# Altium PCB 24V-10A-Power-Board-v1.0.PcbDoc (part 1 of 5)
Units mil, origin at the board's own origin, x right, y up, seen from the top; angles counter-clockwise.
Board outline 6000 x 4000 mil, 2 copper layers (Top Layer, Bottom Layer); 609 components, 307 nets, 1491 pads, 0 vias.
Unrouted connection lines stored in the file: 1132.
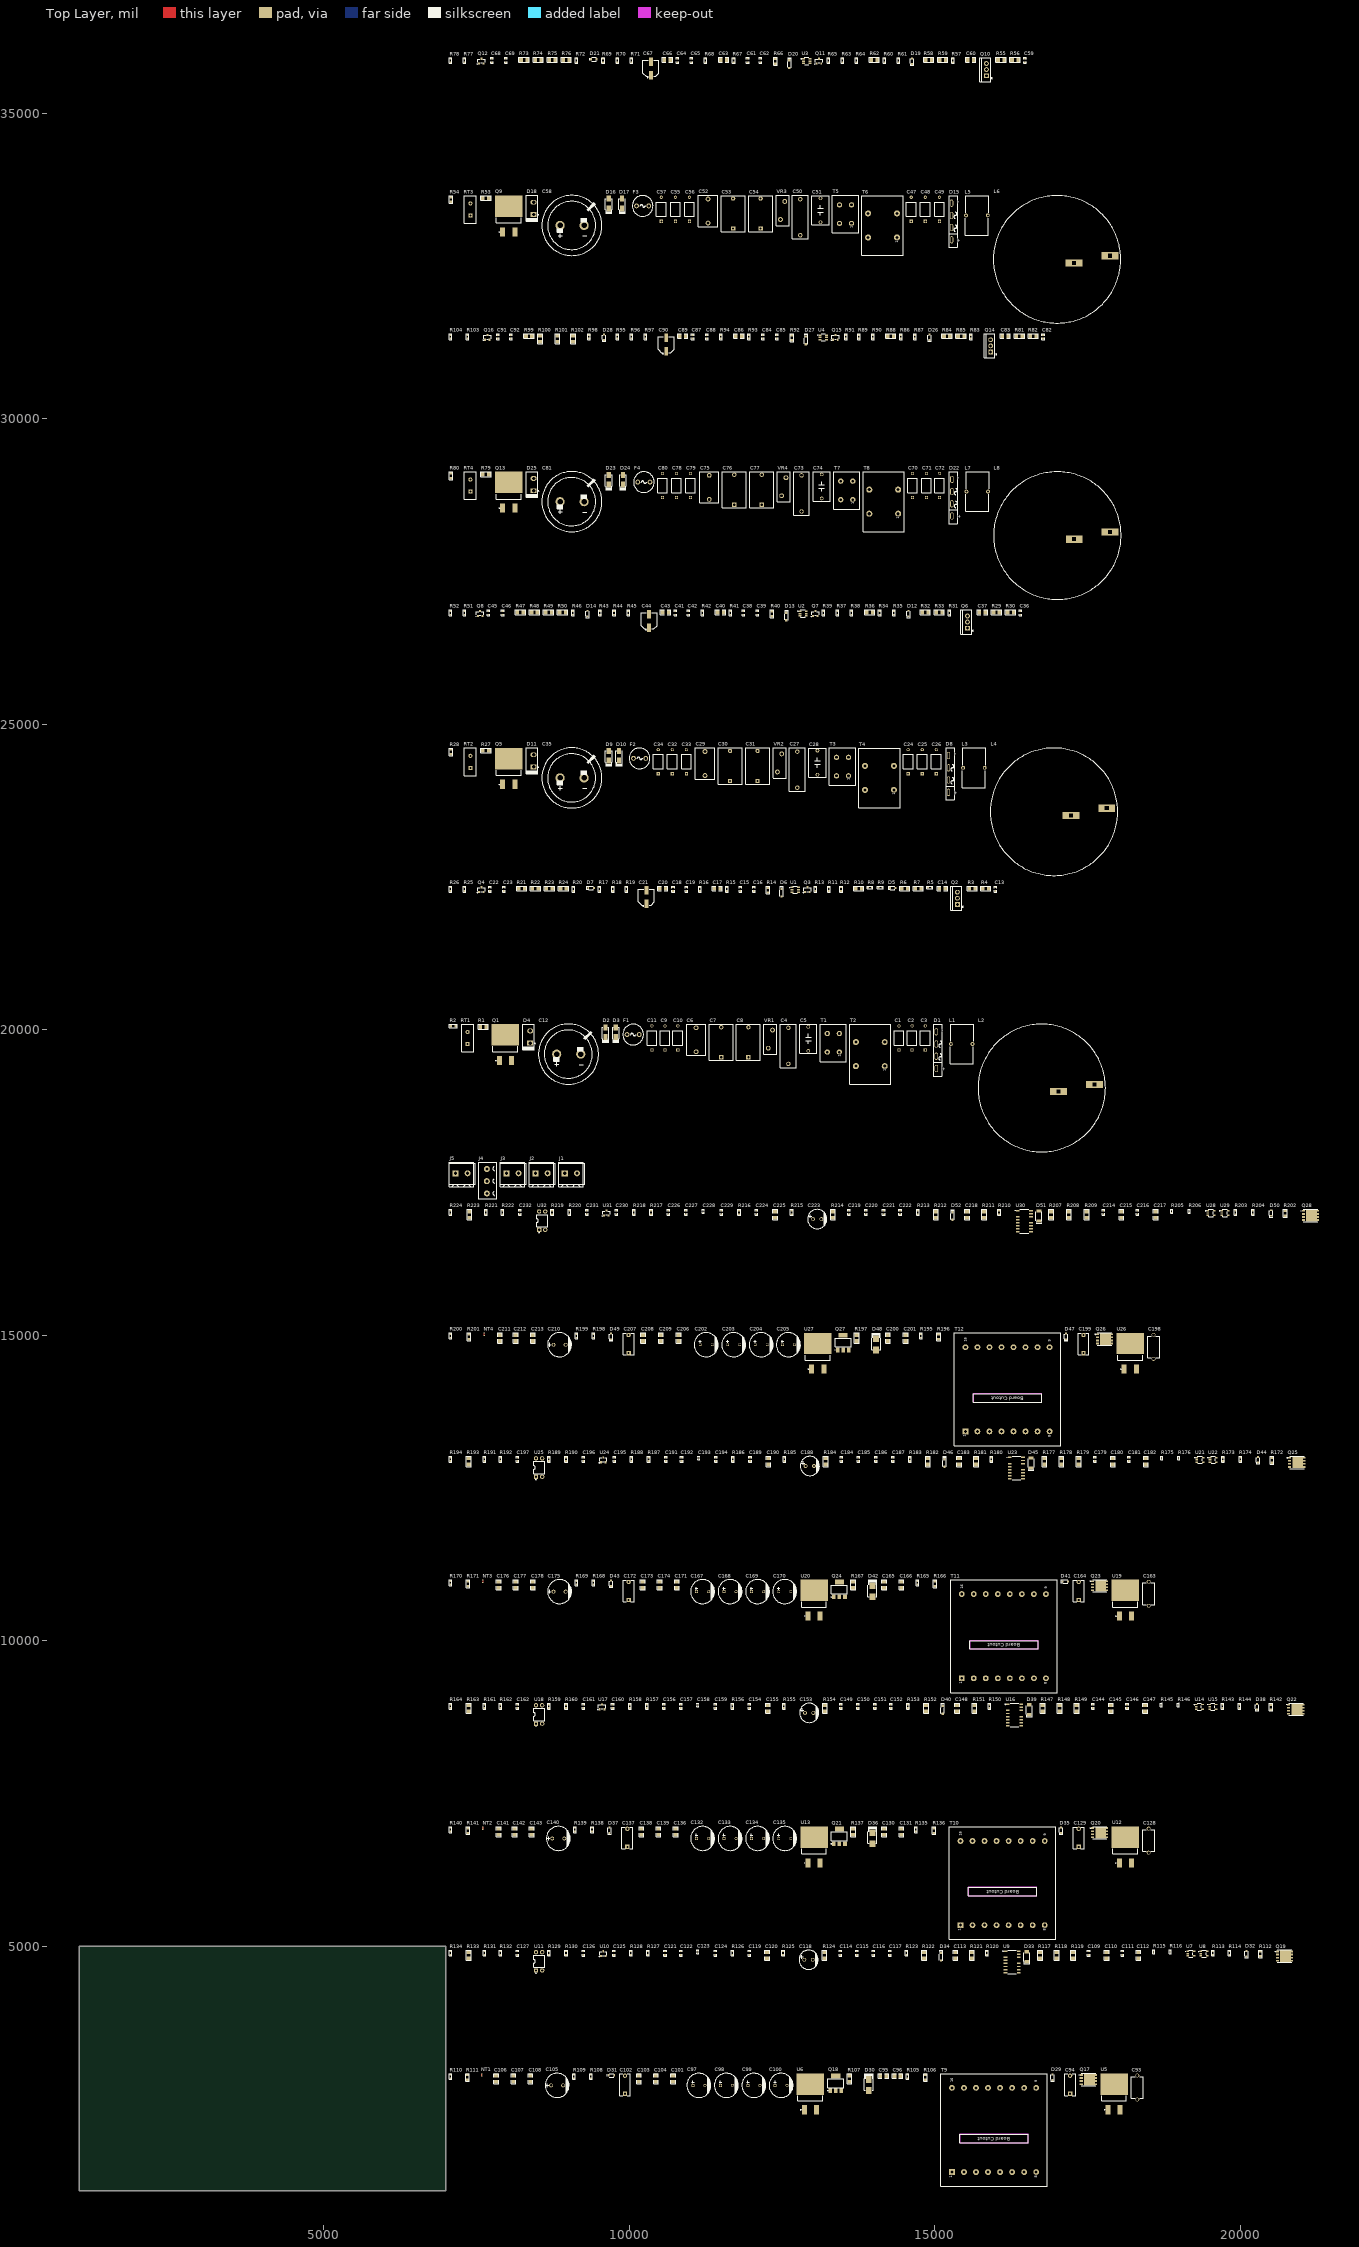
[diagram p0: Top Layer view]
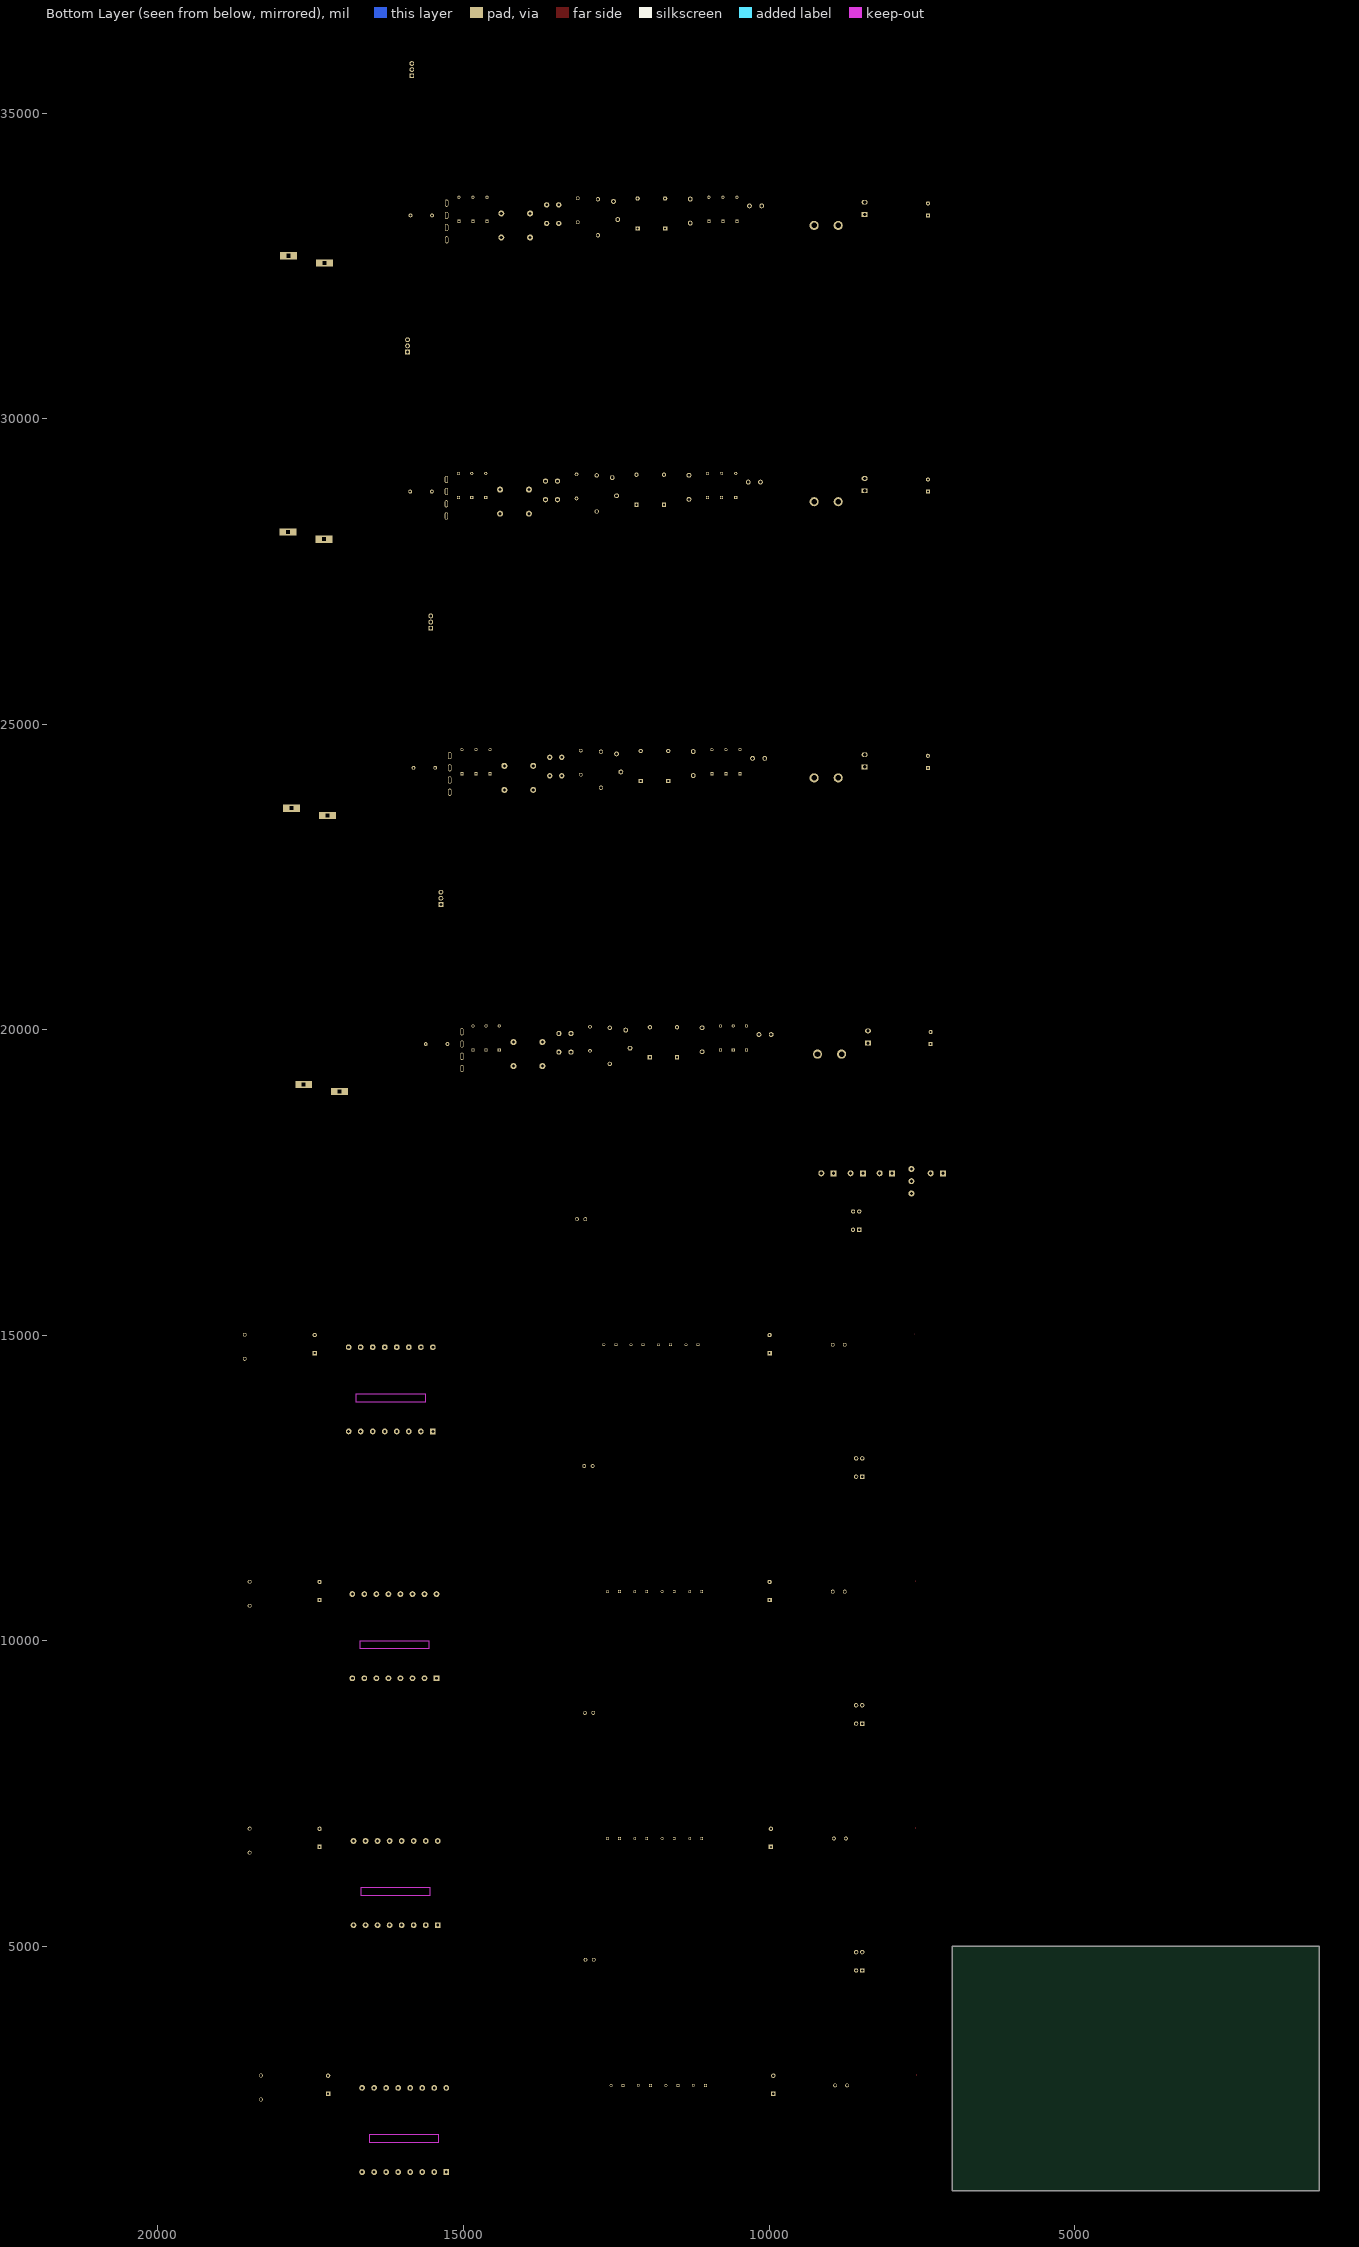
[diagram p1: Bottom Layer view, seen from below]

## Layer stack, top to bottom
Top Solder: solder mask 0.4, Solder Resist, Dk 3.5
Top Layer: signal copper 1.4
Dielectric 1: dielectric 12.6, FR-4, Dk 4.8
Bottom Layer: signal copper 1.4
Bottom Solder: solder mask 0.4, Solder Resist, Dk 3.5

## Board outline
1000,1000 7000,1000 7000,5000 1000,5000

## Design rules (kind name [scope] priority, off if disabled: settings)
Clearance [All] p1: gap=10 ignorepadtopadclearanceinfootprint=FALSE
PolygonConnect [All] p1: connectstyle=Relief reliefconductorwidth=10 reliefentries=4 polygonreliefangle="90 Angle" airgapwidth=10
RoutingVias [All] p1: holewidth=28 width=50 viastyle="Through Hole" minholewidth=28 minwidth=50 maxholewidth=28 maxwidth=50
SolderMaskExpansion [All] p1: expansion=4 istentingtop=FALSE
SupplyNets "Schematic Supply Nets_7" [InNet('GND')] p1: voltage=0.000
SupplyNets "Schematic Supply Nets_6" [InNet('SGND-C1')] p2: voltage=0.000
SupplyNets "Schematic Supply Nets_5" [InNet('SGND-C3')] p3: voltage=0.000
SupplyNets "Schematic Supply Nets_4" [InNet('SGND-C4')] p4: voltage=0.000
SupplyNets "Schematic Supply Nets_3" [InNet('EARTH')] p5: voltage=0.000
SupplyNets "Schematic Supply Nets_2" [InNet('SGND-C2')] p6: voltage=0.000
SupplyNets "Schematic Supply Nets_1" [InNet('AC_N')] p7: voltage=0.000
SupplyNets "Schematic Supply Nets" [InNet('AC_L')] p8: voltage=0.000
Width [All] p1: maxlimit=10 minlimit=10 preferedwidth=10
30 further rules are at their usual default settings.

## Classes and differential pairs
component class U_Power_Sheet4: C47 C48 C49 C50 C51 C52 C53 C54 C55 C56 C57 C58 C59 C60 C61 C62 C63 C64 C65 C66 C67 C68 C69 D15 D16 D17 D18 D19 D20 D21 F3 L5 L6 Q9 Q10 Q11 Q12 R53 R54 R55 R56 R57 R58 R59 R60 R61 R62 R63 R64 R65 R66 R67 R68 R69 R70 R71 R72 R73 R74 R75 R76 R77 R78 RT3 T5 T6 U3 VR3
component class U_Power_Sheet3: C70 C71 C72 C73 C74 C75 C76 C77 C78 C79 C80 C81 C82 C83 C84 C85 C86 C87 C88 C89 C90 C91 C92 D22 D23 D24 D25 D26 D27 D28 F4 L7 L8 Q13 Q14 Q15 Q16 R79 R80 R81 R82 R83 R84 R85 R86 R87 R88 R89 R90 R91 R92 R93 R94 R95 R96 R97 R98 R99 R100 R101 R102 R103 R104 RT4 T7 T8 U4 VR4
component class U_Power_Sheet2: C24 C25 C26 C27 C28 C29 C30 C31 C32 C33 C34 C35 C36 C37 C38 C39 C40 C41 C42 C43 C44 C45 C46 D8 D9 D10 D11 D12 D13 D14 F2 L3 L4 Q5 Q6 Q7 Q8 R27 R28 R29 R30 R31 R32 R33 R34 R35 R36 R37 R38 R39 R40 R41 R42 R43 R44 R45 R46 R47 R48 R49 R50 R51 R52 RT2 T3 T4 U2 VR2
component class U_Power_Sheet1: C1 C2 C3 C4 C5 C6 C7 C8 C9 C10 C11 C12 C13 C14 C15 C16 C17 C18 C19 C20 C21 C22 C23 D1 D2 D3 D4 D5 D6 D7 F1 L1 L2 Q1 Q2 Q3 Q4 R1 R2 R3 R4 R5 R6 R7 R8 R9 R10 R11 R12 R13 R14 R15 R16 R17 R18 R19 R20 R21 R22 R23 R24 R25 R26 RT1 T1 T2 U1 VR1
component class U_Connector_Sheet: J1 J2 J3 J4 J5
component class U_24V_Sheet4: C198 C199 C200 C201 C202 C203 C204 C205 C206 C207 C208 C209 C210 C211 C212 C213 C214 C215 C216 C217 C218 C219 C220 C221 C222 C223 C224 C225 C226 C227 C228 C229 C230 C231 C232 D47 D48 D49 D50 D51 D52 NT4 Q26 Q27 Q28 R195 R196 R197 R198 R199 R200 R201 R202 R203 R204 R205 R206 R207 R208 R209 R210 R211 R212 R213 R214 R215 R216 R217 R218 R219 R220 R221 R222 R223 R224 T12 U26 U27 U28 U29 U30 U31 U32
component class U_24V_Sheet3: C163 C164 C165 C166 C167 C168 C169 C170 C171 C172 C173 C174 C175 C176 C177 C178 C179 C180 C181 C182 C183 C184 C185 C186 C187 C188 C189 C190 C191 C192 C193 C194 C195 C196 C197 D41 D42 D43 D44 D45 D46 NT3 Q23 Q24 Q25 R165 R166 R167 R168 R169 R170 R171 R172 R173 R174 R175 R176 R177 R178 R179 R180 R181 R182 R183 R184 R185 R186 R187 R188 R189 R190 R191 R192 R193 R194 T11 U19 U20 U21 U22 U23 U24 U25
component class U_24V_Sheet2: C128 C129 C130 C131 C132 C133 C134 C135 C136 C137 C138 C139 C140 C141 C142 C143 C144 C145 C146 C147 C148 C149 C150 C151 C152 C153 C154 C155 C156 C157 C158 C159 C160 C161 C162 D35 D36 D37 D38 D39 D40 NT2 Q20 Q21 Q22 R135 R136 R137 R138 R139 R140 R141 R142 R143 R144 R145 R146 R147 R148 R149 R150 R151 R152 R153 R154 R155 R156 R157 R158 R159 R160 R161 R162 R163 R164 T10 U12 U13 U14 U15 U16 U17 U18
component class U_24V_Sheet1: C93 C94 C95 C96 C97 C98 C99 C100 C101 C102 C103 C104 C105 C106 C107 C108 C109 C110 C111 C112 C113 C114 C115 C116 C117 C118 C119 C120 C121 C122 C123 C124 C125 C126 C127 D29 D30 D31 D32 D33 D34 NT1 Q17 Q18 Q19 R105 R106 R107 R108 R109 R110 R111 R112 R113 R114 R115 R116 R117 R118 R119 R120 R121 R122 R123 R124 R125 R126 R127 R128 R129 R130 R131 R132 R133 R134 T9 U5 U6 U7 U8 U9 U10 U11

## Components (designator, comment, footprint, x,y, rotation, side; value= is the part's Value field where it differs from the comment)
C1 "100pF" DE1B3RA101KN4AN01F 14415,19865 r90 top
C2 "220pF" DE1B3RA221KN4AN01F 14630,19865 r90 top
C3 "220pF" DE1B3RA221KN4AN01F 14845,19865 r90 top
C4 "470nF" 450MPK474J 12605,19735 r90 top
C5 "MPP105J2W10KN22605" MPP105J2W10KN22605 12930,19850 r90 top
C6 "220nF" X2P2224KN1B0130150080ES0 11095,19835 r90 top
C7 "0.47UF" 890324024005 11505,19795 r90 top
C8 "0.47UF" 890324024005 11950,19795 r90 top
C9 "220pF" DE1B3RA221KN4AN01F 10585,19865 r90 top
C10 "220pF" DE1B3RA221KN4AN01F 10795,19865 r90 top
C11 "100pF" DE1B3RA101KN4AN01F 10370,19865 r90 top
C12 "150uF" KN151M45025*30A 9010,19600 r0 top
C13 "0.1uF" Cap-0603 15995,22300 r90 top value=100nF
C14 "10pF" Cap-1206 15125,22310 r0 top
C15 "3.9nF" Cap-0603 11820,22300 r90 top
C16 "560pF" Cap-0603 12040,22300 r90 top
C17 "470nF" Cap-1206 11440,22310 r0 top
C18 "68nF" Cap-0603 10720,22300 r90 top
C19 "0.22uF" Cap-0603 10940,22300 r90 top
C20 "0.47uF" Cap-1206 10550,22310 r0 top
C21 "10uF" 50SVPF10M 10280,22170 r90 top
C22 "06031C102KAT2A" Cap-0603 7720,22300 r90 top
C23 "10pF" Cap-0603 7950,22300 r90 top
C24 "100pF" DE1B3RA101KN4AN01F 14565,24385 r90 top
C25 "220pF" DE1B3RA221KN4AN01F 14795,24385 r90 top
C26 "220pF" DE1B3RA221KN4AN01F 15025,24385 r90 top
C27 "470nF" 450MPK474J 12750,24255 r90 top
C28 "MPP105J2W10KN22605" MPP105J2W10KN22605 13080,24370 r90 top
C29 "220nF" X2P2224KN1B0130150080ES0 11240,24355 r90 top
C30 "0.47UF" 890324024005 11650,24315 r90 top
C31 "0.47UF" 890324024005 12100,24315 r90 top
C32 "220pF" DE1B3RA221KN4AN01F 10705,24385 r90 top
C33 "220pF" DE1B3RA221KN4AN01F 10935,24385 r90 top
C34 "100pF" DE1B3RA101KN4AN01F 10475,24385 r90 top
C35 "150uF" KN151M45025*30A 9065,24120 r0 top
C36 "0.1uF" Cap-0603 16405,26820 r90 top value=100nF
C37 "10pF" Cap-1206 15780,26830 r0 top
C38 "3.9nF" Cap-0603 11870,26820 r90 top
C39 "560pF" Cap-0603 12100,26820 r90 top
C40 "470nF" Cap-1206 11495,26830 r0 top
C41 "68nF" Cap-0603 10760,26820 r90 top
C42 "0.22uF" Cap-0603 10970,26820 r90 top
C43 "0.47uF" Cap-1206 10595,26830 r0 top
C44 "10uF" 50SVPF10M 10325,26690 r90 top
C45 "06031C102KAT2A" Cap-0603 7700,26820 r90 top
C46 "10pF" Cap-0603 7930,26820 r90 top
C47 "100pF" DE1B3RA101KN4AN01F 14615,33425 r90 top
C48 "220pF" DE1B3RA221KN4AN01F 14845,33425 r90 top
C49 "220pF" DE1B3RA221KN4AN01F 15075,33425 r90 top
C50 "470nF" 450MPK474J 12800,33295 r90 top
C51 "MPP105J2W10KN22605" MPP105J2W10KN22605 13130,33410 r90 top
C52 "220nF" X2P2224KN1B0130150080ES0 11290,33395 r90 top
C53 "0.47UF" 890324024005 11700,33355 r90 top
C54 "0.47UF" 890324024005 12150,33355 r90 top
C55 "220pF" DE1B3RA221KN4AN01F 10755,33425 r90 top
C56 "220pF" DE1B3RA221KN4AN01F 10985,33425 r90 top
C57 "100pF" DE1B3RA101KN4AN01F 10525,33425 r90 top
C58 "150uF" KN151M45025*30A 9065,33160 r0 top
C59 "0.1uF" Cap-0603 16480,35860 r90 top value=100nF
C60 "10pF" Cap-1206 15590,35870 r0 top
C61 "3.9nF" Cap-0603 11940,35860 r90 top
C62 "560pF" Cap-0603 12150,35860 r90 top
C63 "470nF" Cap-1206 11545,35870 r0 top
C64 "68nF" Cap-0603 10790,35860 r90 top
C65 "0.22uF" Cap-0603 11020,35860 r90 top
C66 "0.47uF" Cap-1206 10625,35870 r0 top
C67 "10uF" 50SVPF10M 10355,35730 r90 top
C68 "06031C102KAT2A" Cap-0603 7755,35860 r90 top
C69 "10pF" Cap-0603 7985,35860 r90 top
C70 "100pF" DE1B3RA101KN4AN01F 14635,28905 r90 top
C71 "220pF" DE1B3RA221KN4AN01F 14865,28905 r90 top
C72 "220pF" DE1B3RA221KN4AN01F 15080,28905 r90 top
C73 "470nF" 450MPK474J 12820,28775 r90 top
C74 "MPP105J2W10KN22605" MPP105J2W10KN22605 13150,28890 r90 top
C75 "220nF" X2P2224KN1B0130150080ES0 11310,28875 r90 top
C76 "0.47UF" 890324024005 11720,28835 r90 top
C77 "0.47UF" 890324024005 12170,28835 r90 top
C78 "220pF" DE1B3RA221KN4AN01F 10775,28905 r90 top
C79 "220pF" DE1B3RA221KN4AN01F 11005,28905 r90 top
C80 "100pF" DE1B3RA101KN4AN01F 10545,28905 r90 top
C81 "150uF" KN151M45025*30A 9065,28640 r0 top
C82 "0.1uF" Cap-0603 16775,31340 r90 top value=100nF
C83 "10pF" Cap-1206 16155,31350 r0 top
C84 "3.9nF" Cap-0603 12190,31340 r90 top
C85 "560pF" Cap-0603 12420,31340 r90 top
C86 "470nF" Cap-1206 11795,31350 r0 top
C87 "68nF" Cap-0603 11040,31340 r90 top
C88 "0.22uF" Cap-0603 11270,31340 r90 top
C89 "0.47uF" Cap-1206 10875,31350 r0 top
C90 "10uF" 50SVPF10M 10605,31210 r90 top
C91 "06031C102KAT2A" Cap-0603 7855,31340 r90 top
C92 "10pF" Cap-0603 8065,31340 r90 top
C93 "2.2nF" DE1E3RA222MA4BN01F 18315,2690 r90 top
C94 "KP223J2J0701" KP223J2J0701 17215,2735 r90 top
C95 "4.7uF" Cap-1206 14160,2880 r0 top
C96 "4.7uF" Cap-1206 14390,2880 r0 top
C97 "680uF" EEU-FR1V681B 11140,2725 r0 top
C98 "680uF" EEU-FR1V681B 11590,2725 r0 top
C99 "680uF" EEU-FR1V681B 12040,2725 r0 top
C100 "680uF" EEU-FR1V681B 12485,2725 r0 top
C101 "0.1uF" Cap-1206 10720,2835 r90 top value=100nF
C102 "KP223J2J0701" KP223J2J0701 9930,2735 r90 top
C103 "150pF" Cap-1206 10160,2835 r90 top
C104 "100pF" Cap-1206 10440,2835 r90 top
C105 "470uF" EEUFR1V471B 8820,2725 r0 top
C106 "2.2uF" Cap-1206 7825,2835 r90 top
C107 "4.7uF" Cap-1206 8105,2835 r90 top
C108 "4.7uF" Cap-1206 8385,2835 r90 top
C109 "2.2uF" CAP-0603 17520,4890 r90 top
C110 "0.1uF" Cap-1206 17815,4855 r90 top value=100nF
C111 "2.2uF" CAP-0603 18070,4890 r90 top
C112 "0.1uF" Cap-1206 18335,4855 r90 top value=100nF
C113 "2.2uF" Cap-1206 15340,4855 r90 top
C114 "4.7uF" Cap-0603 13455,4890 r90 top
C115 "4.7uF" Cap-0603 13725,4890 r90 top
C116 "4.7uF" Cap-0603 13995,4890 r90 top
C117 "0.01uF" Cap-0603 14265,4890 r90 top
C118 "330uF" RC035M331LO8*14TH-2A1E 12935,4780 r0 top
C119 "2.2uF" Cap-0603 11970,4890 r90 top
C120 "1uF" Cap-1206 12260,4855 r90 top
C121 "220pF" Cap-0603 10590,4890 r90 top
C122 "10nF" Cap-0603 10850,4890 r90 top
C123 "47pF" Cap-0402 11125,4910 r90 top
C124 "82nF" Cap-0603 11410,4890 r90 top
C125 "4.7nF" Cap-0603 9750,4890 r90 top
C126 "470pF" Cap-0603 9250,4890 r90 top
C127 "47pF" Cap-0603 8175,4890 r90 top
C128 "2.2nF" DE1E3RA222MA4BN01F 18500,6730 r90 top
C129 "KP223J2J0701" KP223J2J0701 17355,6775 r90 top
C130 "4.7uF" Cap-1206 14175,6875 r90 top
C131 "4.7uF" Cap-1206 14455,6875 r90 top
C132 "680uF" EEU-FR1V681B 11200,6765 r0 top
C133 "680uF" EEU-FR1V681B 11650,6765 r0 top
C134 "680uF" EEU-FR1V681B 12100,6765 r0 top
C135 "680uF" EEU-FR1V681B 12545,6765 r0 top
C136 "0.1uF" Cap-1206 10760,6875 r90 top value=100nF
C137 "KP223J2J0701" KP223J2J0701 9970,6775 r90 top
C138 "150pF" Cap-1206 10200,6875 r90 top
C139 "100pF" Cap-1206 10480,6875 r90 top
C140 "470uF" EEUFR1V471B 8840,6765 r0 top
C141 "2.2uF" Cap-1206 7865,6875 r90 top
C142 "4.7uF" Cap-1206 8125,6875 r90 top
C143 "4.7uF" Cap-1206 8405,6875 r90 top
C144 "2.2uF" CAP-0603 17590,8930 r90 top
C145 "0.1uF" Cap-1206 17885,8895 r90 top value=100nF
C146 "2.2uF" CAP-0603 18150,8930 r90 top
C147 "0.1uF" Cap-1206 18445,8895 r90 top value=100nF
C148 "2.2uF" Cap-1206 15370,8895 r90 top
C149 "4.7uF" Cap-0603 13465,8930 r90 top
C150 "4.7uF" Cap-0603 13745,8930 r90 top
C151 "4.7uF" Cap-0603 14025,8930 r90 top
C152 "0.01uF" Cap-0603 14285,8930 r90 top
C153 "330uF" RC035M331LO8*14TH-2A1E 12945,8820 r0 top
C154 "2.2uF" Cap-0603 11970,8930 r90 top
C155 "1uF" Cap-1206 12270,8895 r90 top
C156 "220pF" Cap-0603 10570,8930 r90 top
C157 "10nF" Cap-0603 10850,8930 r90 top
C158 "47pF" Cap-0402 11125,8950 r90 top
C159 "82nF" Cap-0603 11410,8930 r90 top
C160 "4.7nF" Cap-0603 9730,8930 r90 top
C161 "470pF" Cap-0603 9250,8930 r90 top
C162 "47pF" Cap-0603 8175,8930 r90 top
C163 "2.2nF" DE1E3RA222MA4BN01F 18500,10770 r90 top
C164 "KP223J2J0701" KP223J2J0701 17355,10815 r90 top
C165 "4.7uF" Cap-1206 14175,10915 r90 top
C166 "4.7uF" Cap-1206 14455,10915 r90 top
C167 "680uF" EEU-FR1V681B 11200,10805 r0 top
C168 "680uF" EEU-FR1V681B 11650,10805 r0 top
C169 "680uF" EEU-FR1V681B 12100,10805 r0 top
C170 "680uF" EEU-FR1V681B 12545,10805 r0 top
C171 "0.1uF" Cap-1206 10780,10915 r90 top value=100nF
C172 "KP223J2J0701" KP223J2J0701 9990,10815 r90 top
C173 "150pF" Cap-1206 10220,10915 r90 top
C174 "100pF" Cap-1206 10500,10915 r90 top
C175 "470uF" EEUFR1V471B 8860,10805 r0 top
C176 "2.2uF" Cap-1206 7865,10915 r90 top
C177 "4.7uF" Cap-1206 8145,10915 r90 top
C178 "4.7uF" Cap-1206 8425,10915 r90 top
C179 "2.2uF" CAP-0603 17620,12970 r90 top
C180 "0.1uF" Cap-1206 17915,12935 r90 top value=100nF
C181 "2.2uF" CAP-0603 18180,12970 r90 top
C182 "0.1uF" Cap-1206 18455,12935 r90 top value=100nF
C183 "2.2uF" Cap-1206 15400,12935 r90 top
C184 "4.7uF" Cap-0603 13475,12970 r90 top
C185 "4.7uF" Cap-0603 13755,12970 r90 top
C186 "4.7uF" Cap-0603 14035,12970 r90 top
C187 "0.01uF" Cap-0603 14315,12970 r90 top
C188 "330uF" RC035M331LO8*14TH-2A1E 12955,12860 r0 top
C189 "2.2uF" Cap-0603 11980,12970 r90 top
C190 "1uF" Cap-1206 12280,12935 r90 top
C191 "220pF" Cap-0603 10600,12970 r90 top
C192 "10nF" Cap-0603 10860,12970 r90 top
C193 "47pF" Cap-0402 11135,12990 r90 top
C194 "82nF" Cap-0603 11420,12970 r90 top
C195 "4.7nF" Cap-0603 9760,12970 r90 top
C196 "470pF" Cap-0603 9250,12970 r90 top
C197 "47pF" Cap-0603 8175,12970 r90 top
C198 "2.2nF" DE1E3RA222MA4BN01F 18580,14810 r90 top
C199 "KP223J2J0701" KP223J2J0701 17435,14855 r90 top
C200 "4.7uF" Cap-1206 14235,14955 r90 top
C201 "4.7uF" Cap-1206 14525,14955 r90 top
C202 "680uF" EEU-FR1V681B 11260,14845 r0 top
C203 "680uF" EEU-FR1V681B 11710,14845 r0 top
C204 "680uF" EEU-FR1V681B 12160,14845 r0 top
C205 "680uF" EEU-FR1V681B 12605,14845 r0 top
C206 "0.1uF" Cap-1206 10810,14955 r90 top value=100nF
C207 "KP223J2J0701" KP223J2J0701 9990,14855 r90 top
C208 "150pF" Cap-1206 10230,14955 r90 top
C209 "100pF" Cap-1206 10520,14955 r90 top
C210 "470uF" EEUFR1V471B 8860,14845 r0 top
C211 "2.2uF" Cap-1206 7885,14955 r90 top
C212 "4.7uF" Cap-1206 8145,14955 r90 top
C213 "4.7uF" Cap-1206 8425,14955 r90 top
C214 "2.2uF" CAP-0603 17760,17010 r90 top
C215 "0.1uF" Cap-1206 18055,16975 r90 top value=100nF
C216 "2.2uF" CAP-0603 18320,17010 r90 top
C217 "0.1uF" Cap-1206 18615,16975 r90 top value=100nF
C218 "2.2uF" Cap-1206 15530,16975 r90 top
C219 "4.7uF" Cap-0603 13595,17010 r90 top
C220 "4.7uF" Cap-0603 13875,17010 r90 top
C221 "4.7uF" Cap-0603 14165,17010 r90 top
C222 "0.01uF" Cap-0603 14435,17010 r90 top
C223 "330uF" RC035M331LO8*14TH-2A1E 13075,16900 r0 top
C224 "2.2uF" Cap-0603 12080,17010 r90 top
C225 "1uF" Cap-1206 12390,16975 r90 top
C226 "220pF" Cap-0603 10640,17010 r90 top
C227 "10nF" Cap-0603 10930,17010 r90 top
C228 "47pF" Cap-0402 11215,17030 r90 top
C229 "82nF" Cap-0603 11510,17010 r90 top
C230 "4.7nF" Cap-0603 9790,17010 r90 top
C231 "470pF" Cap-0603 9310,17010 r90 top
C232 "47pF" Cap-0603 8215,17010 r90 top
D1 "GBU806" GBU 15025,19665 r90 top
D2 "MURA160T3G" SMA 9610,19960 r90 top
D3 "MURA160T3G" SMA 9780,19960 r90 top
D4 "STTH8L06FP" TO-220-2 8380,19880 r90 top
D5 "MMDL914-TP" SOD-323 14310,22320 r0 top
D6 "1N4148W" SOD-123 12490,22240 r90 top
D7 "MMDL914-TP" SOD-323 9375,22320 r0 top
D8 "GBU806" GBU 15225,24185 r90 top
D9 "MURA160T3G" SMA 9665,24480 r90 top
D10 "MURA160T3G" SMA 9835,24480 r90 top
D11 "STTH8L06FP" TO-220-2 8435,24400 r90 top
D12 "MMDL914-TP" SOD-323 14570,26810 r90 top
D13 "1N4148W" SOD-123 12570,26760 r90 top
D14 "MMDL914-TP" SOD-323 9315,26810 r90 top
D15 "GBU806" GBU 15275,33225 r90 top
D16 "MURA160T3G" SMA 9665,33520 r90 top
D17 "MURA160T3G" SMA 9885,33520 r90 top
D18 "STTH8L06FP" TO-220-2 8435,33440 r90 top
D19 "MMDL914-TP" SOD-323 14625,35850 r90 top
D20 "1N4148W" SOD-123 12620,35800 r90 top
D21 "MMDL914-TP" SOD-323 9420,35880 r0 top
D22 "GBU806" GBU 15280,28705 r90 top
D23 "MURA160T3G" SMA 9665,29000 r90 top
D24 "MURA160T3G" SMA 9895,29000 r90 top
D25 "STTH8L06FP" TO-220-2 8435,28920 r90 top
D26 "MMDL914-TP" SOD-323 14915,31330 r90 top
D27 "1N4148W" SOD-123 12890,31280 r90 top
D28 "MMDL914-TP" SOD-323 9585,31330 r90 top
D29 "MMDL914-TP" SOD-323 16925,2860 r90 top
D30 "STPS160UY" SMB_ 13920,2730 r90 top
D31 "MMDL914-TP" SOD-323 9710,2890 r0 top
D32 "MMSZ5250BS-7-F" SOD-323 20100,4880 r90 top
D33 "ES1JAF" "DO-214AD (SMAF)" 16505,4830 r90 top value=15pF
D34 "1N4148W-7-F" SOD-123 15100,4830 r90 top value=2pF
D35 "MMDL914-TP" SOD-323 17065,6900 r90 top
D36 "STPS160UY" SMB_ 13980,6770 r90 top
D37 "MMDL914-TP" SOD-323 9680,6900 r90 top
D38 "MMSZ5250BS-7-F" SOD-323 20275,8920 r90 top
D39 "ES1JAF" "DO-214AD (SMAF)" 16545,8870 r90 top value=15pF
D40 "1N4148W-7-F" SOD-123 15130,8870 r90 top value=2pF
D41 "MMDL914-TP" SOD-323 17135,10970 r0 top
D42 "STPS160UY" SMB_ 13980,10810 r90 top
D43 "MMDL914-TP" SOD-323 9700,10940 r90 top
D44 "MMSZ5250BS-7-F" SOD-323 20290,12960 r90 top
D45 "ES1JAF" "DO-214AD (SMAF)" 16575,12910 r90 top value=15pF
D46 "1N4148W-7-F" SOD-123 15160,12910 r90 top value=2pF
D47 "MMDL914-TP" SOD-323 17145,14980 r90 top
D48 "STPS160UY" SMB_ 14040,14850 r90 top
D49 "MMDL914-TP" SOD-323 9700,14980 r90 top
D50 "MMSZ5250BS-7-F" SOD-323 20505,17000 r90 top
D51 "ES1JAF" "DO-214AD (SMAF)" 16705,16950 r90 top value=15pF
D52 "1N4148W-7-F" SOD-123 15290,16950 r90 top value=2pF
F1 "5A 250VAC" 37215000001 10065,19920 r0 top
F2 "37215000001" 37215000001 10170,24440 r0 top
F3 "37215000001" 37215000001 10220,33480 r0 top
F4 "37215000001" 37215000001 10240,28960 r0 top
J1 "WJ500V-5.08-2P" WJ500V-5.08-2P 9045,17650 r0 top
J2 "WJ500V-5.08-2P" WJ500V-5.08-2P 8565,17650 r0 top
J3 "WJ500V-5.08-2P" WJ500V-5.08-2P 8090,17650 r0 top
J4 "WJ500V-5.08-3P" WJ500V-5.08-3P 7670,17320 r90 top
J5 "WJ500V-5.08-2P" WJ500V-5.08-2P 7255,17650 r0 top
L1 "100uH" 7447021 15440,19765 r90 top
L2 "118uH" 760801401 17615,19105 r0 top
L3 "100uH" 7447021 15640,24285 r90 top
L4 "118uH" 760801401 17815,23625 r0 top
L5 "100uH" 7447021 15690,33325 r90 top
L6 "118uH" 760801401 17865,32665 r0 top
L7 "100uH" 7447021 15695,28805 r90 top
L8 "118uH" 760801401 17870,28145 r0 top
NT1 "Net Tie_SMD" "Net Tie Pad" 7585,2895 r90 top net-tie
NT2 "Net Tie_SMD" "Net Tie Pad" 7605,6935 r90 top net-tie
NT3 "Net Tie_SMD" "Net Tie Pad" 7605,10975 r90 top net-tie
NT4 "Net Tie_SMD" "Net Tie Pad" 7625,15015 r90 top net-tie
Q1 "STB26NM60N" TO-263 7975,19705 r0 top
Q2 "IPP60R099C7XKSA1" TO-220-3 15370,22150 r90 top
Q3 "SI2309CDS-T1-E3" SOT-23 12915,22290 r0 top
Q4 "MMBT4401-7-F" SOT-23 7580,22290 r0 top
Q5 "STB26NM60N" TO-263 8030,24225 r0 top
Q6 "IPP60R099C7XKSA1" TO-220-3 15535,26670 r90 top
Q7 "SI2309CDS-T1-E3" SOT-23 13045,26810 r0 top
Q8 "MMBT4401-7-F" SOT-23 7560,26810 r0 top
Q9 "STB26NM60N" TO-263 8030,33265 r0 top
Q10 "IPP60R099C7XKSA1" TO-220-3 15845,35710 r90 top
Q11 "SI2309CDS-T1-E3" SOT-23 13105,35850 r0 top
Q12 "MMBT4401-7-F" SOT-23 7580,35850 r0 top
Q13 "STB26NM60N" TO-263 8030,28745 r0 top
Q14 "IPP60R099C7XKSA1" TO-220-3 15915,31190 r90 top
Q15 "SI2309CDS-T1-E3" SOT-23 13375,31330 r0 top
Q16 "MMBT4401-7-F" SOT-23 7680,31330 r0 top
Q17 "CSD19502Q5B" VSON-CLIP-8(6x5) 17515,2820 r0 top
Q18 "FZT651TA" "SOT- 223" 13380,2760 r0 top
Q19 "CSD19502Q5B" VSON-CLIP-8(6x5) 20725,4840 r0 top
Q20 "CSD19502Q5B" VSON-CLIP-8(6x5) 17700,6860 r0 top
Q21 "FZT651TA" "SOT- 223" 13440,6800 r0 top
Q22 "CSD19502Q5B" VSON-CLIP-8(6x5) 20910,8880 r0 top
Q23 "CSD19502Q5B" VSON-CLIP-8(6x5) 17700,10900 r0 top
Q24 "FZT651TA" "SOT- 223" 13440,10840 r0 top
Q25 "CSD19502Q5B" VSON-CLIP-8(6x5) 20925,12920 r0 top
Q26 "CSD19502Q5B" VSON-CLIP-8(6x5) 17780,14940 r0 top
Q27 "FZT651TA" "SOT- 223" 13500,14880 r0 top
Q28 "CSD19502Q5B" VSON-CLIP-8(6x5) 21150,16960 r0 top
R1 "3.09MR" Res-1206 7610,20050 r0 top
R2 "1M" RES-0805 7120,20060 r0 top value=1MR
R3 "3.3MR" Res-1206 15615,22310 r0 top
R4 "3.09MR" Res-1206 15835,22310 r0 top
R5 "10R" Res-0603 14920,22330 r0 top
R6 "3.3MR" Res-1206 14510,22310 r0 top
R7 "3.3MR" Res-1206 14730,22310 r0 top
R8 "1R" Res-0603 13940,22330 r0 top
R9 "82.5K" Res-0603 14110,22330 r0 top
R10 "3.3MR" Res-1206 13755,22310 r0 top
R11 "36.5K" Res-0603 13270,22300 r90 top
R12 "120K" Res-0603 13470,22300 r90 top value=120kR
R13 "3K" Res-0603 13050,22300 r90 top value=3kR
R14 "10R" RES-0805 12270,22285 r90 top
R15 "24.3K" Res-0603 11600,22300 r90 top
R16 "100K" Res-0603 11160,22300 r90 top value=100kR
R17 "390K" Res-0603 9515,22300 r90 top value=390kR
R18 "75K" Res-0603 9735,22300 r90 top value=75kR
R19 "75K" Res-0603 9955,22300 r90 top value=75kR
R20 "140K" Res-0603 9090,22300 r90 top
R21 "130mR" Res-1206 8240,22310 r0 top
R22 "130mR" Res-1206 8465,22310 r0 top
R23 "150mR" Res-1206 8695,22310 r0 top
R24 "150mR" Res-1206 8925,22310 r0 top
R25 "390K" Res-0603 7305,22300 r90 top value=390kR
R26 "49K9" Res-0603 7075,22300 r90 top
R27 "3.09MR" Res-1206 7655,24570 r0 top
R28 "1M" RES-0805 7085,24545 r90 top value=1MR
R29 "3.3MR" Res-1206 16010,26830 r0 top
R30 "3.09MR" Res-1206 16240,26830 r0 top
R31 "10R" Res-0603 15240,26820 r90 top
R32 "3.3MR" Res-1206 14845,26830 r0 top
R33 "3.3MR" Res-1206 15075,26830 r0 top
R34 "1R" Res-0603 14100,26820 r90 top
R35 "82.5K" Res-0603 14330,26820 r90 top
R36 "3.3MR" Res-1206 13935,26830 r0 top
R37 "36.5K" Res-0603 13410,26820 r90 top
R38 "120K" Res-0603 13640,26820 r90 top value=120kR
R39 "3K" Res-0603 13180,26820 r90 top value=3kR
R40 "10R" RES-0805 12340,26805 r90 top
R41 "24.3K" Res-0603 11660,26820 r90 top
R42 "100K" Res-0603 11200,26820 r90 top value=100kR
R43 "390K" Res-0603 9525,26820 r90 top value=390kR
R44 "75K" Res-0603 9755,26820 r90 top value=75kR
R45 "75K" Res-0603 9985,26820 r90 top value=75kR
R46 "140K" Res-0603 9080,26820 r90 top
R47 "130mR" Res-1206 8220,26830 r0 top
R48 "130mR" Res-1206 8450,26830 r0 top
R49 "150mR" Res-1206 8680,26830 r0 top
R50 "150mR" Res-1206 8910,26830 r0 top
R51 "390K" Res-0603 7305,26820 r90 top value=390kR
R52 "49K9" Res-0603 7075,26820 r90 top
R53 "3.09MR" Res-1206 7655,33610 r0 top
R54 "1M" RES-0805 7085,33585 r90 top value=1MR
R55 "3.3MR" Res-1206 16085,35870 r0 top
R56 "3.09MR" Res-1206 16315,35870 r0 top
R57 "10R" Res-0603 15295,35860 r90 top
R58 "3.3MR" Res-1206 14900,35870 r0 top
R59 "3.3MR" Res-1206 15130,35870 r0 top
R60 "1R" Res-0603 14180,35860 r90 top
R61 "82.5K" Res-0603 14405,35860 r90 top
R62 "3.3MR" Res-1206 14010,35870 r0 top
R63 "36.5K" Res-0603 13490,35860 r90 top
R64 "120K" Res-0603 13720,35860 r90 top value=120kR
R65 "3K" Res-0603 13260,35860 r90 top value=3kR
R66 "10R" RES-0805 12390,35845 r90 top
R67 "24.3K" Res-0603 11710,35860 r90 top
R68 "100K" Res-0603 11250,35860 r90 top value=100kR
R69 "390K" Res-0603 9575,35860 r90 top value=390kR
R70 "75K" Res-0603 9805,35860 r90 top value=75kR
R71 "75K" Res-0603 10035,35860 r90 top value=75kR
R72 "140K" Res-0603 9135,35860 r90 top
R73 "130mR" Res-1206 8280,35870 r0 top
R74 "130mR" Res-1206 8510,35870 r0 top
R75 "150mR" Res-1206 8740,35870 r0 top
R76 "150mR" Res-1206 8970,35870 r0 top
R77 "390K" Res-0603 7305,35860 r90 top value=390kR
R78 "49K9" Res-0603 7075,35860 r90 top
R79 "3.09MR" Res-1206 7655,29090 r0 top
R80 "1M" RES-0805 7085,29065 r90 top value=1MR
R81 "3.3MR" Res-1206 16385,31350 r0 top
R82 "3.09MR" Res-1206 16610,31350 r0 top
R83 "10R" Res-0603 15595,31340 r90 top
R84 "3.3MR" Res-1206 15200,31350 r0 top
R85 "3.3MR" Res-1206 15430,31350 r0 top
R86 "1R" Res-0603 14445,31340 r90 top
R87 "82.5K" Res-0603 14675,31340 r90 top
R88 "3.3MR" Res-1206 14280,31350 r0 top
R89 "36.5K" Res-0603 13760,31340 r90 top
R90 "120K" Res-0603 13990,31340 r90 top value=120kR
R91 "3K" Res-0603 13550,31340 r90 top value=3kR
R92 "10R" RES-0805 12660,31325 r90 top
R93 "24.3K" Res-0603 11960,31340 r90 top
R94 "100K" Res-0603 11500,31340 r90 top value=100kR
R95 "390K" Res-0603 9805,31340 r90 top value=390kR
R96 "75K" Res-0603 10035,31340 r90 top value=75kR
R97 "75K" Res-0603 10265,31340 r90 top value=75kR
R98 "140K" Res-0603 9345,31340 r90 top
R99 "130mR" Res-1206 8360,31350 r0 top
R100 "130mR" Res-1206 8545,31305 r90 top
R101 "150mR" Res-1206 8825,31305 r90 top
R102 "150mR" Res-1206 9085,31305 r90 top
R103 "390K" Res-0603 7355,31340 r90 top value=390kR
R104 "49K9" Res-0603 7075,31340 r90 top
R105 "10R" Res-0603 14555,2870 r90 top
R106 "10K" RES-0805 14845,2855 r90 top
R107 "0R" Res-1206 13605,2835 r90 top value=0mR
R108 "26.1K" Res-0603 9375,2870 r90 top value=26.1kR
R109 "7.15K" Res-0603 9095,2870 r90 top
R110 "10R" Res-0603 7075,2870 r90 top
R111 "10K" RES-0805 7355,2855 r90 top
R112 "5.6K" RES-0805 20330,4875 r90 top value=5.6kR
R113 "10K" Res-0603 19555,4890 r90 top value=10kR
R114 "4.99K" Res-0603 19825,4890 r90 top
R115 "0R" Res-0402 18585,4910 r90 top
R116 "0R" Res-0402 18855,4910 r90 top
R117 "1.65K" Res-1206 16725,4855 r90 top
R118 "1.65K" Res-1206 16995,4855 r90 top
R119 "1.65K" Res-1206 17265,4855 r90 top
R120 "2.2R" Res-0603 15855,4890 r90 top
R121 "4.99MR" Res-1206 15610,4855 r90 top
R122 "4.99MR" Res-1206 14830,4855 r90 top
R123 "274K" Res-0603 14535,4890 r90 top
R124 "4.99MR" Res-1206 13195,4855 r90 top
R125 "100R" Res-0603 12520,4890 r90 top
R126 "301K" res-0603 11690,4890 r90 top
R127 "37.4K" Res-0603 10310,4890 r90 top
R128 "44.2K" Res-0603 10030,4890 r90 top
R129 "0R" Res-0603 8690,4890 r90 top
R130 "324K" Res-0603 8970,4890 r90 top value=324kR
R131 "324K" Res-0603 7635,4890 r90 top value=324kR
R132 "20R" Res-0603 7895,4890 r90 top
R133 "20K" Res-1206 7375,4855 r90 top
R134 "12.4K" Res-0603 7075,4890 r90 top value=12.4kR
R135 "10R" Res-0603 14695,6910 r90 top
R136 "10K" RES-0805 14985,6895 r90 top
R137 "0R" Res-1206 13665,6875 r90 top value=0mR
R138 "26.1K" Res-0603 9395,6910 r90 top value=26.1kR
R139 "7.15K" Res-0603 9115,6910 r90 top
R140 "10R" Res-0603 7075,6910 r90 top
R141 "10K" RES-0805 7365,6895 r90 top
R142 "5.6K" RES-0805 20505,8915 r90 top value=5.6kR
R143 "10K" Res-0603 19710,8930 r90 top value=10kR
R144 "4.99K" Res-0603 19990,8930 r90 top
R145 "0R" Res-0402 18705,8950 r90 top
R146 "0R" Res-0402 18985,8950 r90 top
R147 "1.65K" Res-1206 16765,8895 r90 top
R148 "1.65K" Res-1206 17045,8895 r90 top
R149 "1.65K" Res-1206 17325,8895 r90 top
R150 "2.2R" Res-0603 15895,8930 r90 top
R151 "4.99MR" Res-1206 15650,8895 r90 top
R152 "4.99MR" Res-1206 14860,8895 r90 top
R153 "274K" Res-0603 14565,8930 r90 top
R154 "4.99MR" Res-1206 13205,8895 r90 top
R155 "100R" Res-0603 12530,8930 r90 top
R156 "301K" res-0603 11690,8930 r90 top
R157 "37.4K" Res-0603 10290,8930 r90 top
R158 "44.2K" Res-0603 10010,8930 r90 top
R159 "0R" Res-0603 8690,8930 r90 top
R160 "324K" Res-0603 8970,8930 r90 top value=324kR
R161 "324K" Res-0603 7635,8930 r90 top value=324kR
R162 "20R" Res-0603 7895,8930 r90 top
R163 "20K" Res-1206 7375,8895 r90 top
R164 "12.4K" Res-0603 7075,8930 r90 top value=12.4kR
R165 "10R" Res-0603 14715,10950 r90 top
R166 "10K" RES-0805 15005,10935 r90 top
R167 "0R" Res-1206 13665,10915 r90 top value=0mR
R168 "26.1K" Res-0603 9415,10950 r90 top value=26.1kR
R169 "7.15K" Res-0603 9135,10950 r90 top
R170 "10R" Res-0603 7075,10950 r90 top
R171 "10K" RES-0805 7365,10935 r90 top
R172 "5.6K" RES-0805 20520,12955 r90 top value=5.6kR
R173 "10K" Res-0603 19720,12970 r90 top value=10kR
R174 "4.99K" Res-0603 20000,12970 r90 top
R175 "0R" Res-0402 18715,12990 r90 top
R176 "0R" Res-0402 18995,12990 r90 top
R177 "1.65K" Res-1206 16795,12935 r90 top
R178 "1.65K" Res-1206 17075,12935 r90 top
R179 "1.65K" Res-1206 17355,12935 r90 top
R180 "2.2R" Res-0603 15925,12970 r90 top
R181 "4.99MR" Res-1206 15680,12935 r90 top
R182 "4.99MR" Res-1206 14890,12935 r90 top
R183 "274K" Res-0603 14595,12970 r90 top
R184 "4.99MR" Res-1206 13215,12935 r90 top
R185 "100R" Res-0603 12540,12970 r90 top
R186 "301K" res-0603 11700,12970 r90 top
R187 "37.4K" Res-0603 10320,12970 r90 top
R188 "44.2K" Res-0603 10040,12970 r90 top
R189 "0R" Res-0603 8690,12970 r90 top
R190 "324K" Res-0603 8970,12970 r90 top value=324kR
R191 "324K" Res-0603 7635,12970 r90 top value=324kR
R192 "20R" Res-0603 7895,12970 r90 top
R193 "20K" Res-1206 7375,12935 r90 top
R194 "12.4K" Res-0603 7075,12970 r90 top value=12.4kR
R195 "10R" Res-0603 14775,14990 r90 top
R196 "10K" RES-0805 15065,14975 r90 top
R197 "0R" Res-1206 13725,14955 r90 top value=0mR
R198 "26.1K" Res-0603 9415,14990 r90 top value=26.1kR
R199 "7.15K" Res-0603 9135,14990 r90 top
R200 "10R" Res-0603 7075,14990 r90 top
R201 "10K" RES-0805 7375,14975 r90 top
R202 "5.6K" RES-0805 20735,16995 r90 top value=5.6kR
R203 "10K" Res-0603 19920,17010 r90 top value=10kR
R204 "4.99K" Res-0603 20210,17010 r90 top
R205 "0R" Res-0402 18875,17030 r90 top
R206 "0R" Res-0402 19165,17030 r90 top
R207 "1.65K" Res-1206 16905,16975 r90 top
R208 "1.65K" Res-1206 17195,16975 r90 top
R209 "1.65K" Res-1206 17485,16975 r90 top
R210 "2.2R" Res-0603 16055,17010 r90 top
R211 "4.99MR" Res-1206 15810,16975 r90 top
R212 "4.99MR" Res-1206 15020,16975 r90 top
R213 "274K" Res-0603 14725,17010 r90 top
R214 "4.99MR" Res-1206 13335,16975 r90 top
R215 "100R" Res-0603 12660,17010 r90 top
R216 "301K" res-0603 11800,17010 r90 top
R217 "37.4K" Res-0603 10360,17010 r90 top
R218 "44.2K" Res-0603 10080,17010 r90 top
R219 "0R" Res-0603 8740,17010 r90 top
R220 "324K" Res-0603 9020,17010 r90 top value=324kR
R221 "324K" Res-0603 7655,17010 r90 top value=324kR
R222 "20R" Res-0603 7925,17010 r90 top
R223 "20K" Res-1206 7385,16975 r90 top
R224 "12.4K" Res-0603 7075,17010 r90 top value=12.4kR
RT1 "B57236S0100M000" B57236S0100M000 7355,19765 r90 top
RT2 "B57236S0100M000" B57236S0100M000 7400,24285 r90 top
RT3 "B57236S0100M000" B57236S0100M000 7400,33325 r90 top
RT4 "B57236S0100M000" B57236S0100M000 7400,28805 r90 top
T1 "744822301" 744822301 13340,19785 r90 top
T2 "744824310" 744824310 13945,19600 r90 top value=10mH
T3 "744822301" 744822301 13490,24305 r90 top
T4 "744824310" 744824310 14095,24120 r90 top value=10mH
T5 "744822301" 744822301 13540,33345 r90 top
T6 "744824310" 744824310 14145,33160 r90 top value=10mH
T7 "744822301" 744822301 13560,28825 r90 top
T8 "744824310" 744824310 14165,28640 r90 top value=10mH
T9 "760895741" 760895741 15970,1995 r90 top value=400uH
T10 "760895741" 760895741 16110,6035 r90 top value=400uH
T11 "760895741" 760895741 16130,10075 r90 top value=400uH
T12 "760895741" 760895741 16190,14115 r90 top value=400uH
U1 "UCC28056DBVT" SOT-23-6 12715,22290 r0 top
U2 "UCC28056DBVT" SOT-23-6 12845,26810 r0 top
U3 "UCC28056DBVT" SOT-23-6 12905,35850 r0 top
U4 "UCC28056DBVT" SOT-23-6 13175,31330 r0 top
U5 "IPB65R150CFDA" TO-263 17935,2535 r0 top
U6 "IPB65R150CFDA" TO-263 12965,2535 r0 top
U7 "UCC24612-2DBVR" SOT-23-5 19190,4880 r0 top
U8 "UCC24612-2DBVR" SOT-23-5 19405,4880 r0 top
U9 "UCC256404DDBR" UCC256404DDBR 16265,4745 r0 top
U10 "ATL432LIAQDBZRQ1" SOT-23 9575,4880 r0 top
U11 "VO618A-3" DIP-4 8525,4755 r90 top
U12 "IPB65R150CFDA" TO-263 18120,6575 r0 top
U13 "IPB65R150CFDA" TO-263 13025,6575 r0 top
U14 "UCC24612-2DBVR" SOT-23-5 19330,8920 r0 top
U15 "UCC24612-2DBVR" SOT-23-5 19550,8920 r0 top
U16 "UCC256404DDBR" UCC256404DDBR 16305,8785 r0 top
U17 "ATL432LIAQDBZRQ1" SOT-23 9555,8920 r0 top
U18 "VO618A-3" DIP-4 8525,8795 r90 top
U19 "IPB65R150CFDA" TO-263 18120,10615 r0 top
U20 "IPB65R150CFDA" TO-263 13025,10615 r0 top
U21 "UCC24612-2DBVR" SOT-23-5 19340,12960 r0 top
U22 "UCC24612-2DBVR" SOT-23-5 19555,12960 r0 top
U23 "UCC256404DDBR" UCC256404DDBR 16335,12825 r0 top
U24 "ATL432LIAQDBZRQ1" SOT-23 9575,12960 r0 top
U25 "VO618A-3" DIP-4 8525,12835 r90 top
U26 "IPB65R150CFDA" TO-263 18200,14655 r0 top
U27 "IPB65R150CFDA" TO-263 13085,14655 r0 top
U28 "UCC24612-2DBVR" SOT-23-5 19520,17000 r0 top
U29 "UCC24612-2DBVR" SOT-23-5 19750,17000 r0 top
U30 "UCC256404DDBR" UCC256404DDBR 16465,16865 r0 top
U31 "ATL432LIAQDBZRQ1" SOT-23 9625,17000 r0 top
U32 "VO618A-3" DIP-4 8575,16875 r90 top
VR1 "B72210S2271K101" B72210S2271K101 12310,19845 r90 top value=195pF
VR2 "B72210S2271K101" B72210S2271K101 12460,24365 r90 top value=195pF
VR3 "B72210S2271K101" B72210S2271K101 12510,33405 r90 top value=195pF
VR4 "B72210S2271K101" B72210S2271K101 12530,28885 r90 top value=195pF

## Footprints (in the part's own frame and the unit in brackets; to place one, negate y for a bottom-side part, rotate by r counter-clockwise, add the part's x,y. Pads: shape width x height; smd on the part's side, far side on the other; paste and mask are expansions set on the pad)
50SVPF10M [mm]
  rect 3.5x1.6 smd: 1(-2.8,0) 2(2.8,0)
  silkscreen extent -4.01,-3.3 3.3,3.3, body extent -3.65,-3.3 3.65,3.3, height 5.9
450MPK474J [mm]
  round 1.8 hole 1.092 paste-2539.97 mask+0: 1(-7.5,0) 2(7.5,0)
  silkscreen extent -9.06,-3.3 9.06,3.3, body extent -9,-3.25 9,3.25, height 11.8
7447021 [mm]
  round 1.6 hole 0.82: 1(0,4.5) 2(0,-4.5)
  silkscreen extent -8.25,-4.78 8.25,4.8, body extent -8.21,-4.75 8.21,4.75, height 16.41
744822301 [mm]
  round 2.2 hole 1.1: 1(-3.85,-2.5) 2(3.85,-2.5) 3(3.85,2.5) 4(-3.85,2.5)
  silkscreen extent -7.81,-5.43 7.81,5.43, body extent -7.76,-5.4 7.76,5.37, height 19.6
744824310 [mm]
  round 2.5 hole 1.3: 1(-5,-6) 2(5,-6) 3(5,6) 4(-5,6)
  silkscreen extent -12.45,-8.53 12.42,8.59, body extent -12.4,-8.5 12.4,8.53, height 29.58
760801401 [mm]
  rect 7x3 hole 1.5 square: 1(0,0) 2(-14.95,-3)
  round 0 hole 4.4 unplated: M1(-21.95,-1.5)
  silkscreen extent -48.45,-28 4.55,25, body extent -46.09,-25.64 5.01,22.54, height 27.69
760895741 [mm]
  rect 2.4x2.4 hole 1.2: 1(-17.5,17.5)
  round 2.4 hole 1.2: 2(-17.5,12.5) 3(-17.5,7.5) 4(-17.5,2.5) 5(-17.5,-2.5) 6(-17.5,-7.5) 7(-17.5,-12.5) 8(-17.5,-17.5) 9(17.5,-17.5) 10(17.5,-12.5) 11(17.5,-7.5) 12(17.5,-2.5) 13(17.5,2.5) 14(17.5,7.5) 15(17.5,12.5) 16(17.5,17.5)
  Keep-Out Layer board cut-out: -1.8,14.25 -5.3,14.25 -5.3,-14.25 -1.8,-14.25
  silkscreen extent -23.42,-22.12 23.42,22.12, body extent -23.3,-22 23.3,22, height 26.85
37215000001 [mm]
  round 2 hole 1.2 paste-2539.97 mask+0.051: 1(-2.54,0) 2(2.54,0)
  silkscreen extent -4.3,-4.3 4.3,4.3, body extent -4.2,-4.19 4.2,4.19, height 8
890324024005 [mm]
  rect 1.8x1.8 hole 0.92: 1(-6.25,0)
  round 1.8 hole 0.92: 2(6.25,0)
  silkscreen extent -7.5,-5 7.5,5, body extent -7.5,-5 7.5,5, height 16.2
B57236S0100M000 [mm]
  rect 1.7x1.7 hole 0.85: 1(0,0)
  round 1.7 hole 0.85: 2(5,0)
  silkscreen extent -3.25,-2.5 8.25,2.5, body extent -3.25,-3 8.25,3, height 15.98
B72210S2271K101 [mm]
  round 2 hole 1.2 paste-2539.97 mask+0.051: 1(-3.749,0.899) 2(3.749,-0.899)
  silkscreen extent -6.27,-2.72 6.25,2.7, body extent -6.25,-2.7 6.25,2.7, height 13.35
Cap-0402 [mil]
  rect 18x25 smd mask+2.36: 1(-18.5,0) 2(18.5,0)
  silkscreen extent -31,-16 31,16, body extent -20,-10 20,10, height 19
Cap-0603 [mil]
  rect 30x35 smd mask+2.36: 1(-30,0) 2(30,0)
  silkscreen extent -49,-21 49,21, body extent -32,-16 31,16, height 34
CAP-0603 [mil]
  rect 30x35 smd mask+2.36: 1(-30,0) 2(30,0)
  silkscreen extent -49,-21 49,21, body extent -32,-16 31,16, height 34
Cap-1206 [mil] "SMD 1206"
  rect 60x70 smd: 1(-50,0) 2(50,0)
  silkscreen extent -84,-39 84,39, body extent -63,-31 63,32, height 39
DE1B3RA101KN4AN01F [mm]
  rect 1.3x1.3 hole 0.8: 1(-5,0)
  round 1.3 hole 0.8: 2(5,0)
  silkscreen extent -3,-2 3,2, body extent -5.5,-2 5.5,2, height 9
DE1B3RA221KN4AN01F [mm]
  rect 1.3x1.3 hole 0.8: 1(-5,0)
  round 1.3 hole 0.8: 2(5,0)
  silkscreen extent -3,-2 3,2, body extent -5.5,-2 5.5,2, height 9
DE1E3RA222MA4BN01F [mm]
  round 1.6 hole 1.1 paste-2539.97 mask+0.051: 1(-5,0) 2(5,0)
  silkscreen extent -4.5,-2.5 4.5,2.5, body extent -5.34,-2.53 5.34,2.47, height 13
DIP-4 [mm]
  rect 1.8x1.8 hole 1 paste-2539.97 mask+0.051: 1(-3.81,1.265)
  round 1.8 hole 1 copper offset 0,0 paste-2539.97 mask+0.051: 2(-3.81,-1.275) 3(3.81,-1.265) 4(3.81,1.275)
  silkscreen extent -4.98,-2.28 2.53,2.29, body extent -3.91,-2.3 3.91,2.3, height 4.29
"DO-214AD (SMAF)" [mm]
  rect 1.34x1.9 smd paste+0 mask+0.051: 1(-2.08,0) 2(2.08,0)
  silkscreen extent -3.28,-1.3 1.75,1.3, body extent -2.35,-1.25 2.35,1.25, height 1
EEU-FR1V681B [mm]
  rect 1.2x1.2 hole 0.85: 1(-2.5,0)
  round 1.2 hole 0.85: 2(2.5,0)
  silkscreen extent -5,-5 5.03,5, body extent -5,-5 5,5, height 20
EEUFR1V471B [mm]
  round 1.6 hole 1 paste-2539.97 mask+0.05: 1(-2.5,0) 2(2.5,0)
  silkscreen extent -5,-5 5,5, body extent -4.99,-5 5,5, height 24.91
GBU [mm]
  oval 3x1.4 hole 0.7 slot 2.2 at 0 deg paste-2539.97 mask+0.051: 1(-7.62,0) 2(-2.54,0) 3(2.54,0) 4(7.62,0)
  silkscreen extent -10.8,-2.28 10.79,1.25, body extent -10.75,-2.26 10.75,1.2, height 19.9
KN151M45025*30A [mm]
  round 3.8 hole 2.3 paste-2539.97 mask+0.05: 1(-5,0) 2(5,0)
  silkscreen extent -12.58,-12.5 12.42,12.5, body extent -12.51,-12.49 12.5,12.5, height 40.01
KP223J2J0701 [mm]
  rect 1.8x1.8 hole 0.914 paste-2539.97 mask+0.051: 1(-3.75,0)
  round 1.8 hole 0.914 paste-2539.97 mask+0.051: 2(3.75,0)
  silkscreen extent -4.5,-2.25 4.5,2.25, body extent -4.5,-2.2 4.5,2.2, height 11.57
MPP105J2W10KN22605 [mil]
  round 60 hole 36 paste-99999 mask+1.97: 1(-196.85,0) 2(196.85,0)
  silkscreen extent -239,-142 239,142, body extent -236,-140 236,140, height 673
"Net Tie Pad" [mil]
  rect 18x25 smd mask-10: 1(-18.5,0) 2(18.5,0)
  Top Layer region: -15,-5 15,-5 15,5 -15,5
RC035M331LO8*14TH-2A1E [mm]
  round 1.6 hole 1 paste-2539.97 mask+0.051: 1(-1.75,0) 2(1.75,0)
  silkscreen extent -3.96,-4 4.04,4, body extent -4,-4.01 4,4, height 8
Res-0402 [mil]
  rect 18x25 smd mask+2.17: 1(-18.5,0) 2(18.5,0)
  silkscreen extent -32,-17 32,16, body extent -23,-11 23,11, height 16
Res-0603 [mil]
  rect 30x35 smd: 1(-30,0) 2(30,0)
  silkscreen extent -48,-21 48,21, body extent -31,-17 31,17, height 18
res-0603 [mil]
  rect 30x35 smd: 1(-30,0) 2(30,0)
  silkscreen extent -48,-21 48,21, body extent -31,-17 31,17, height 18
RES-0805 [mil] "SMD 0805"
  rect 40x50 smd: 1(-40,0) 2(40,0)
  silkscreen extent -64,-29 64,29, body extent -39,-25 39,24, height 24
Res-1206 [mil]
  rect 60x70 smd: 1(-50,0) 2(50,0)
  silkscreen extent -84,-39 84,39, body extent -63,-31 63,31, height 24
SMA [mm]
  rect 2.5x1.7 smd: 1(-2,0) 2(2,0)
  silkscreen extent -4.45,-1.42 2.06,1.42, body extent -2.6,-1.3 2.6,1.3, height 2.4
SMB_ [mm]
  rect 2.8x2.4 smd: 1(-2.3,0) 2(2.3,0)
  silkscreen extent -2.21,-1.91 4.83,1.91, body extent -2.7,-1.8 2.7,1.8, height 2.3
SOD-123 [mm]
  rect 0.95x0.9 smd: 1(-1.575,0) 2(1.575,0)
  silkscreen extent -1.37,-0.8 2.82,0.8, body extent -1.82,-0.78 1.83,0.78, height 1.5
SOD-323 [mm]
  rect 0.8x0.9 smd mask+0.055: 1(-1.15,0) 2(1.15,0)
  silkscreen extent -2.01,-0.79 0.94,0.79, body extent -1.3,-0.67 1.3,0.67, height 1.1
SOT-23 [mm] "TRANS NPN 40V 0.6A SOT23"
  rect 0.82x0.92 smd: 1(-0.95,-1) 2(0.95,-1) 3(0,1)
  silkscreen extent -1.68,-1.3 1.55,0.81, body extent -1.5,-1.25 1.5,1.25, height 1.05
SOT-23-5 [mm]
  rect 1.1x0.6 smd: 1(-1.3,0.95) 2(-1.3,0) 3(-1.3,-0.95) 4(1.3,-0.95) 5(1.3,0.95)
  silkscreen extent -2.13,-1.5 0.88,1.5, body extent -1.4,-1.45 1.4,1.45, height 1.45
SOT-23-6 [mm]
  rect 1.22x0.62 smd: 1(-1.31,0.95) 2(-1.31,0) 3(-1.31,-0.95) 4(1.31,-0.95) 5(1.31,0) 6(1.31,0.95)
  silkscreen extent -2.18,-1.52 0.86,1.52, body extent -1.5,-1.5 1.5,1.5, height 1.47
"SOT- 223" [mm]
  rect 1.5x2 smd: 1(-2.3,-3.05) 2(0,-3.05) 3(2.3,-3.05)
  rect 3.8x2 smd: 4(0,3.05)
  silkscreen extent -3.35,-3.2 3.3,1.8, body extent -3.25,-3.5 3.25,3.5, height 1.61
TO-220-2 [mm]
  rect 2x2.5 hole 1.4 paste-2539.97 mask+0.051: 1(-2.54,0)
  oval 2x2.5 hole 1.4 paste-2539.97 mask+0.051: 2(2.54,0)
  silkscreen extent -5.35,-2.06 5.35,3.13, body extent -5.33,-1.71 5.33,3.1, height 22.95
TO-220-3 [mm]
  rect 2x2 hole 1.2 paste-2539.97 mask+0.051: 1(-2.54,0)
  round 2 hole 1.2 paste-2539.97 mask+0.051: 2(0,0) 3(2.54,0)
  silkscreen extent -5,-2.49 5.03,2.72, body extent -5.05,-1.75 5.05,2.75, height 14.9
TO-263 [mm]
  rect 2.08x3.81 smd: 1(-2.54,-5.335) 3(2.54,-5.335)
  rect 11.43x8.89 smd: 2(0,5.335)
  silkscreen extent -5.21,-5.46 5.11,0.51, body extent -5.08,-6.6 5.02,8.79, height 4.5
UCC256404DDBR [mm]
  rect 1.55x0.6 smd paste+0 mask+0.05: 1(-2.775,4.445) 3(-2.775,1.905) 4(-2.775,0.635) 5(-2.775,-0.635) 6(-2.775,-1.905) 7(-2.775,-3.175) 8(-2.775,-4.445) 9(2.775,-4.445) 10(2.775,-3.175) 11(2.775,-1.905) 12(2.775,-0.635) 14(2.775,1.905) 15(2.775,3.175) 16(2.775,4.445)
  silkscreen extent -3.82,-4.9 1.8,4.9, body extent -3,-4.95 3,4.95, height 1.75
VSON-CLIP-8(6x5) [mm]
  rect 1.27x0.7 smd paste-100 mask+0.051: 1(-3,1.904) 2(-3,0.636) 3(-3,-0.636) 4(-3,-1.906)
  rect 1x0.7 smd paste-100 mask+0.051: 5(3,-1.904) 6(3,-0.634) 7(3,0.636) 8(3,1.906)
  rect 4.5x4.9 smd paste-100 mask+0.051: 8(0.39,0.001)
  silkscreen extent -3.91,-2.57 3,2.55, body extent -3,-2.45 3,2.45, height 1.1
WJ500V-5.08-2P [mm]
  rect 2.5x2.5 hole 1.3 paste-2539.97 mask+0.051: 1(-2.54,0)
  round 2.5 hole 1.3 paste-2539.97 mask+0.051: 2(2.54,0)
  silkscreen extent -5.08,-5.56 5.68,4.6, body extent -5.08,-5.5 5.68,4.5, height 14
WJ500V-5.08-3P [mm]
  round 2.5 hole 1.3: 1(0,0) 2(5.08,0) 3(10.16,0)
  silkscreen extent -2.29,-4.11 12.95,3.49, body extent -2.22,-4.07 12.95,3.43, height 10
X2P2224KN1B0130150080ES0 [mm]
  round 2 hole 1.2 paste-2539.97 mask+0.05: 1(-5,0) 2(5,0)
  silkscreen extent -6.5,-4 6.5,4, body extent -6.5,-4 6.5,4, height 15

## Part data
C1 C11 C24 C34 C47 C57 C70 C80: library part DE1B3RA101KN4AN01F, "CAP CER 100PF 250V RADIAL", LCSC Part Number=C3285641, Manufacturer=Murata, ComponentLink1Description=https://search.murata.co.jp/Ceramy/image/img/A01X/G101/ENG/DE1_RA_N01F_E.pdf?src-supplier=Digikey, ComponentLink1URL=https://search.murata.co.jp/Ceramy/image/img/A01X/G101/ENG/DE1_RA_N01F_E.pdf?src-supplier=Digikey, Height=9mm, Item Type=Capacitors, Manufacturer Part Number=DE1B3RA101KN4AN01F, Material=4241ConductorMaterial, Pricing="1=0.3, 10=0.147, 50=0.147, 100=0.123, 1000=0.089, 10000=0.061 (USD)", RoHS=Yes, Stock=583, Supplier=Mouser
C2 C3 C9 C10 C25 C26 C32 C33 C48 C49 C55 C56 C71 C72 C78 C79: library part DE1B3RA221KN4AN01F, "CAP CER 220PF 250V RADIAL", LCSC Part Number=C1622503, Manufacturer=Murata, ComponentLink1Description=https://search.murata.co.jp/Ceramy/image/img/A01X/G101/ENG/DE1_RA_N01F_E.pdf?src-supplier=Digikey, ComponentLink1URL=https://search.murata.co.jp/Ceramy/image/img/A01X/G101/ENG/DE1_RA_N01F_E.pdf?src-supplier=Digikey, Item Type="Suppression Capacitor", Manufacturer Part Number=DE1B3RA221KN4AN01F, Pricing="1=0.35, 10=0.168, 50=0.168, 100=0.141, 1000=0.107, 10000=0.069 (USD)", RoHS=Yes, Stock=985, Supplier=Mouser
C4 C27 C50 C73: library part 450MPK474J, "CAP FILM 0.47UF 5% 450VDC RADIAL", Case/Package=Radial, Dielectric Material=Polypropylene, LCSC Part Number=C2798220, Manufacturer=Rubycon, Max Operating Temperature=105°C, Min Operating Temperature=-40°C, Package Quantity=1, Tolerance=5%, Voltage Rating (DC)=450V, ComponentLink1Description=https://datasheet.ciiva.com/6281/e-mpk-6281321.pdf?src-supplier=Digikey, ComponentLink1URL=https://datasheet.ciiva.com/6281/e-mpk-6281321.pdf?src-supplier=Digikey, ComponentLink2Description=https://datasheet.ciiva.com/15021/e-mpk-15021932.pdf?src-supplier=Digikey, ComponentLink2URL=https://datasheet.ciiva.com/15021/e-mpk-15021932.pdf?src-supplier=Digikey, Height - Seated (Max)=0.433inch, Item Type="Film Capacitors", Lead Pitch=0.591inch, Length=0.709inch, Manufacturer Part Number=450MPK474J, Mounting Technology="Through Hole", Packaging="Cut Tape", Pricing="1=0.84, 10=0.605, 100=0.4311, 4000=0.26942, 8000=0.25962, 12000=0.25531 (USD)", RoHS=Yes, RoHS Compliant=Yes, Series=MPK, Stock=4083, Supplier=Digikey, Termination="PC Pins", Width=0.256inch
C5 C28 C51 C74: "1uF -40℃~+105℃ ±5% 450V Plugin,P=10mm Polypropylene Film Capacitors (CBB) ROHS", LCSC Part Number=C2686214, Manufacturer=KNSCHA, Item Type=Capacitor, Manufacturer Part Number=MPP105J2W10KN22605, RoHS=No, Supplier=LCSC
C6 C29 C52 C75: library part X2P2224KN1B0130150080ES0, "220nF ±10% X2 275V Plugin,P=10mm Suppression Capacitors ROHS", LCSC Part Number=C286022, Manufacturer=STE, Package=Plugin,P=10mm, ComponentLink1Description=LCSC, ComponentLink1URL=https://www.lcsc.com/product-detail/Suppression-Capacitors_STE-Songtian-Elec-X2P2224KN1B0130150080ES0_C286022.html, Item Type="Suppression Capacitor", Manufacturer Part Number=X2P2224KN1B0130150080ES0
C7 C8 C30 C31 C53 C54 C76 C77: library part 890324024005, "CAP FILM 0.47UF 10% 275VAC RAD", Manufacturer="Wurth Electronics", Supplier Part Number=732-5890-ND, ComponentLink1Description=http://www.farnell.com/datasheets/1867975.pdf?src-supplier=Farnell, ComponentLink1URL=http://www.farnell.com/datasheets/1867975.pdf?src-supplier=Farnell, ComponentLink2Description=http://www.farnell.com/datasheets/1867975.pdf?src-supplier=Element14, ComponentLink2URL=http://www.farnell.com/datasheets/1867975.pdf?src-supplier=Element14, ComponentLink3Description=https://katalog.we-online.de/pbs/datasheet/890324024005.pdf?src-supplier=Digikey, ComponentLink3URL=https://katalog.we-online.de/pbs/datasheet/890324024005.pdf?src-supplier=Digikey, ComponentLink4Description=http://www.farnell.com/datasheets/1867975.pdf?src-supplier=Newark, ComponentLink4URL=http://www.farnell.com/datasheets/1867975.pdf?src-supplier=Newark, Item Type=Capacitor, Manufacturer Part Number=890324024005, Pricing="1=0.75, 50=0.645, 100=0.574, 250=0.501, 500=0.454, 1000=0.418 (USD)", RoHS=Yes, Stock=13537, Supplier=Digikey
C12 C35 C58 C81: library part KN151M45025*30A, "20% 900mA@120Hz 10mm 450V 150uF Plugin,D25xL30mm Horn-Type Electrolytic Capacitors ROHS", LCSC Part Number=C513373, Manufacturer=KFSON, Package=Plugin,D25xL30mm, ComponentLink1Description=LCSC, ComponentLink1URL=https://www.lcsc.com/product-detail/Horn-Type-Electrolytic-Capacitors_KFSON-KN151M45025-30A_C513373.html, Item Type=Capacitor, Manufacturer Part Number=KN151M45025*30A
C13 C36 C59 C82: library part CL10B104KB8WPNC, "CAP CER 0.1UF 50V X7R 0603", Case Code (Imperial)=0603, Case Code (Metric)=1608, LCSC Part Number=C307348, Max Operating Temperature=125°C, Min Operating Temperature=-55°C, Ratings=AEC-Q200, Supplier Part Number=2575919, Tolerance=10%, Voltage Rating=50V, Case/Package=0603, Category="Ceramic Capacitors", ComponentLink1Description=LCSC, ComponentLink2Description=http://www.farnell.com/datasheets/2710560.pdf?src-supplier=Farnell, ComponentLink2URL=http://www.farnell.com/datasheets/2710560.pdf?src-supplier=Farnell, ComponentLink3Description=http://www.samsungsem.com/kr/support/product-search/mlcc/CL10B104KB8WPNC.jsp?src-supplier=Digi-Key, ComponentLink3URL=http://www.samsungsem.com/kr/support/product-search/mlcc/CL10B104KB8WPNC.jsp?src-supplier=Digi-Key, ComponentLink4Description=http://www.farnell.com/datasheets/2710560.pdf?src-supplier=Element14, ComponentLink4URL=http://www.farnell.com/datasheets/2710560.pdf?src-supplier=Element14, ComponentLink5Description=https://datasheet.octopart.com/CL10B104KB8WPNC-Samsung-Electro-Mechanics-datasheet-120093645.pdf?src-supplier=Future+Electronics, ComponentLink5URL=https://datasheet.octopart.com/CL10B104KB8WPNC-Samsung-Electro-Mechanics-datasheet-120093645.pdf?src-supplier=Future+Electronics, ComponentLink6Description=http://www.farnell.com/datasheets/2710560.pdf?src-supplier=Newark, ComponentLink6URL=http://www.farnell.com/datasheets/2710560.pdf?src-supplier=Newark, ComponentLink7Description=http://www.samsungsem.com/servlet/FileDownload?type=spec&file=CL10B104KB8WPNC.pdf&src-supplier=Avnet, ComponentLink7URL=http://www.samsungsem.com/servlet/FileDownload?type=spec&file=CL10B104KB8WPNC.pdf&src-supplier=Avnet, ComponentLink8Description=https://datasheet.octopart.com/CL10B104KB8WPNC-Samsung-datasheet-8326407.pdf?src-supplier=TME, ComponentLink8URL=https://datasheet.octopart.com/CL10B104KB8WPNC-Samsung-datasheet-8326407.pdf?src-supplier=TME, Height=900um, Item Type=Capacitor, Lead Free=5697LeadFree, Material=4241ConductorMaterial, Mounting Technology="Surface Mount", Packaging="Cut Tape", Pricing="100=0.021, 500=0.019, 1000=0.015, 2000=0.01 (GBP)", RoHS=Yes, RoHS Compliant=Yes, Series=CL, Stock=400, Supplier=Rs, Voltage Rating (DC)=50V
C14 C37 C60 C83: library part CC1206JKNPOCBN100, "CAP CER 10PF 1KV C0G/NPO 1206", LCSC Part Number=C107172, Manufacturer=Yageo, ComponentLink1Description=https://datasheet.ciiva.com/11494/hv-11494856.pdf?src-supplier=Avnet, ComponentLink1URL=https://datasheet.ciiva.com/11494/hv-11494856.pdf?src-supplier=Avnet, Item Type=Capacitor, Manufacturer Part Number=CC1206JKNPOCBN100, Pricing="3000=0.0222, 9000=0.0214, 15000=0.021, 60000=0.0201, 90000=0.0194 (USD)", RoHS=Yes, Stock=9000, Supplier="Future Electronics"